# Altium PCB STM32H743I-EVAL2PCBDESIGN.PcbDoc (part 22 of 23)
Units mil, origin at the board's own origin, x right, y up, seen from the top; angles counter-clockwise.
Board outline 6558 x 5417 mil, 8 copper layers (L1_TOP, L2_GND, L3_HS1, L4_POWER, L5_SIG, L6_HS2, L7_GND, L8_BOTTOM), stack 61.368 mil thick; 620 components, 588 nets, 2945 pads, 1724 vias.
Unrouted connection lines stored in the file: 1.
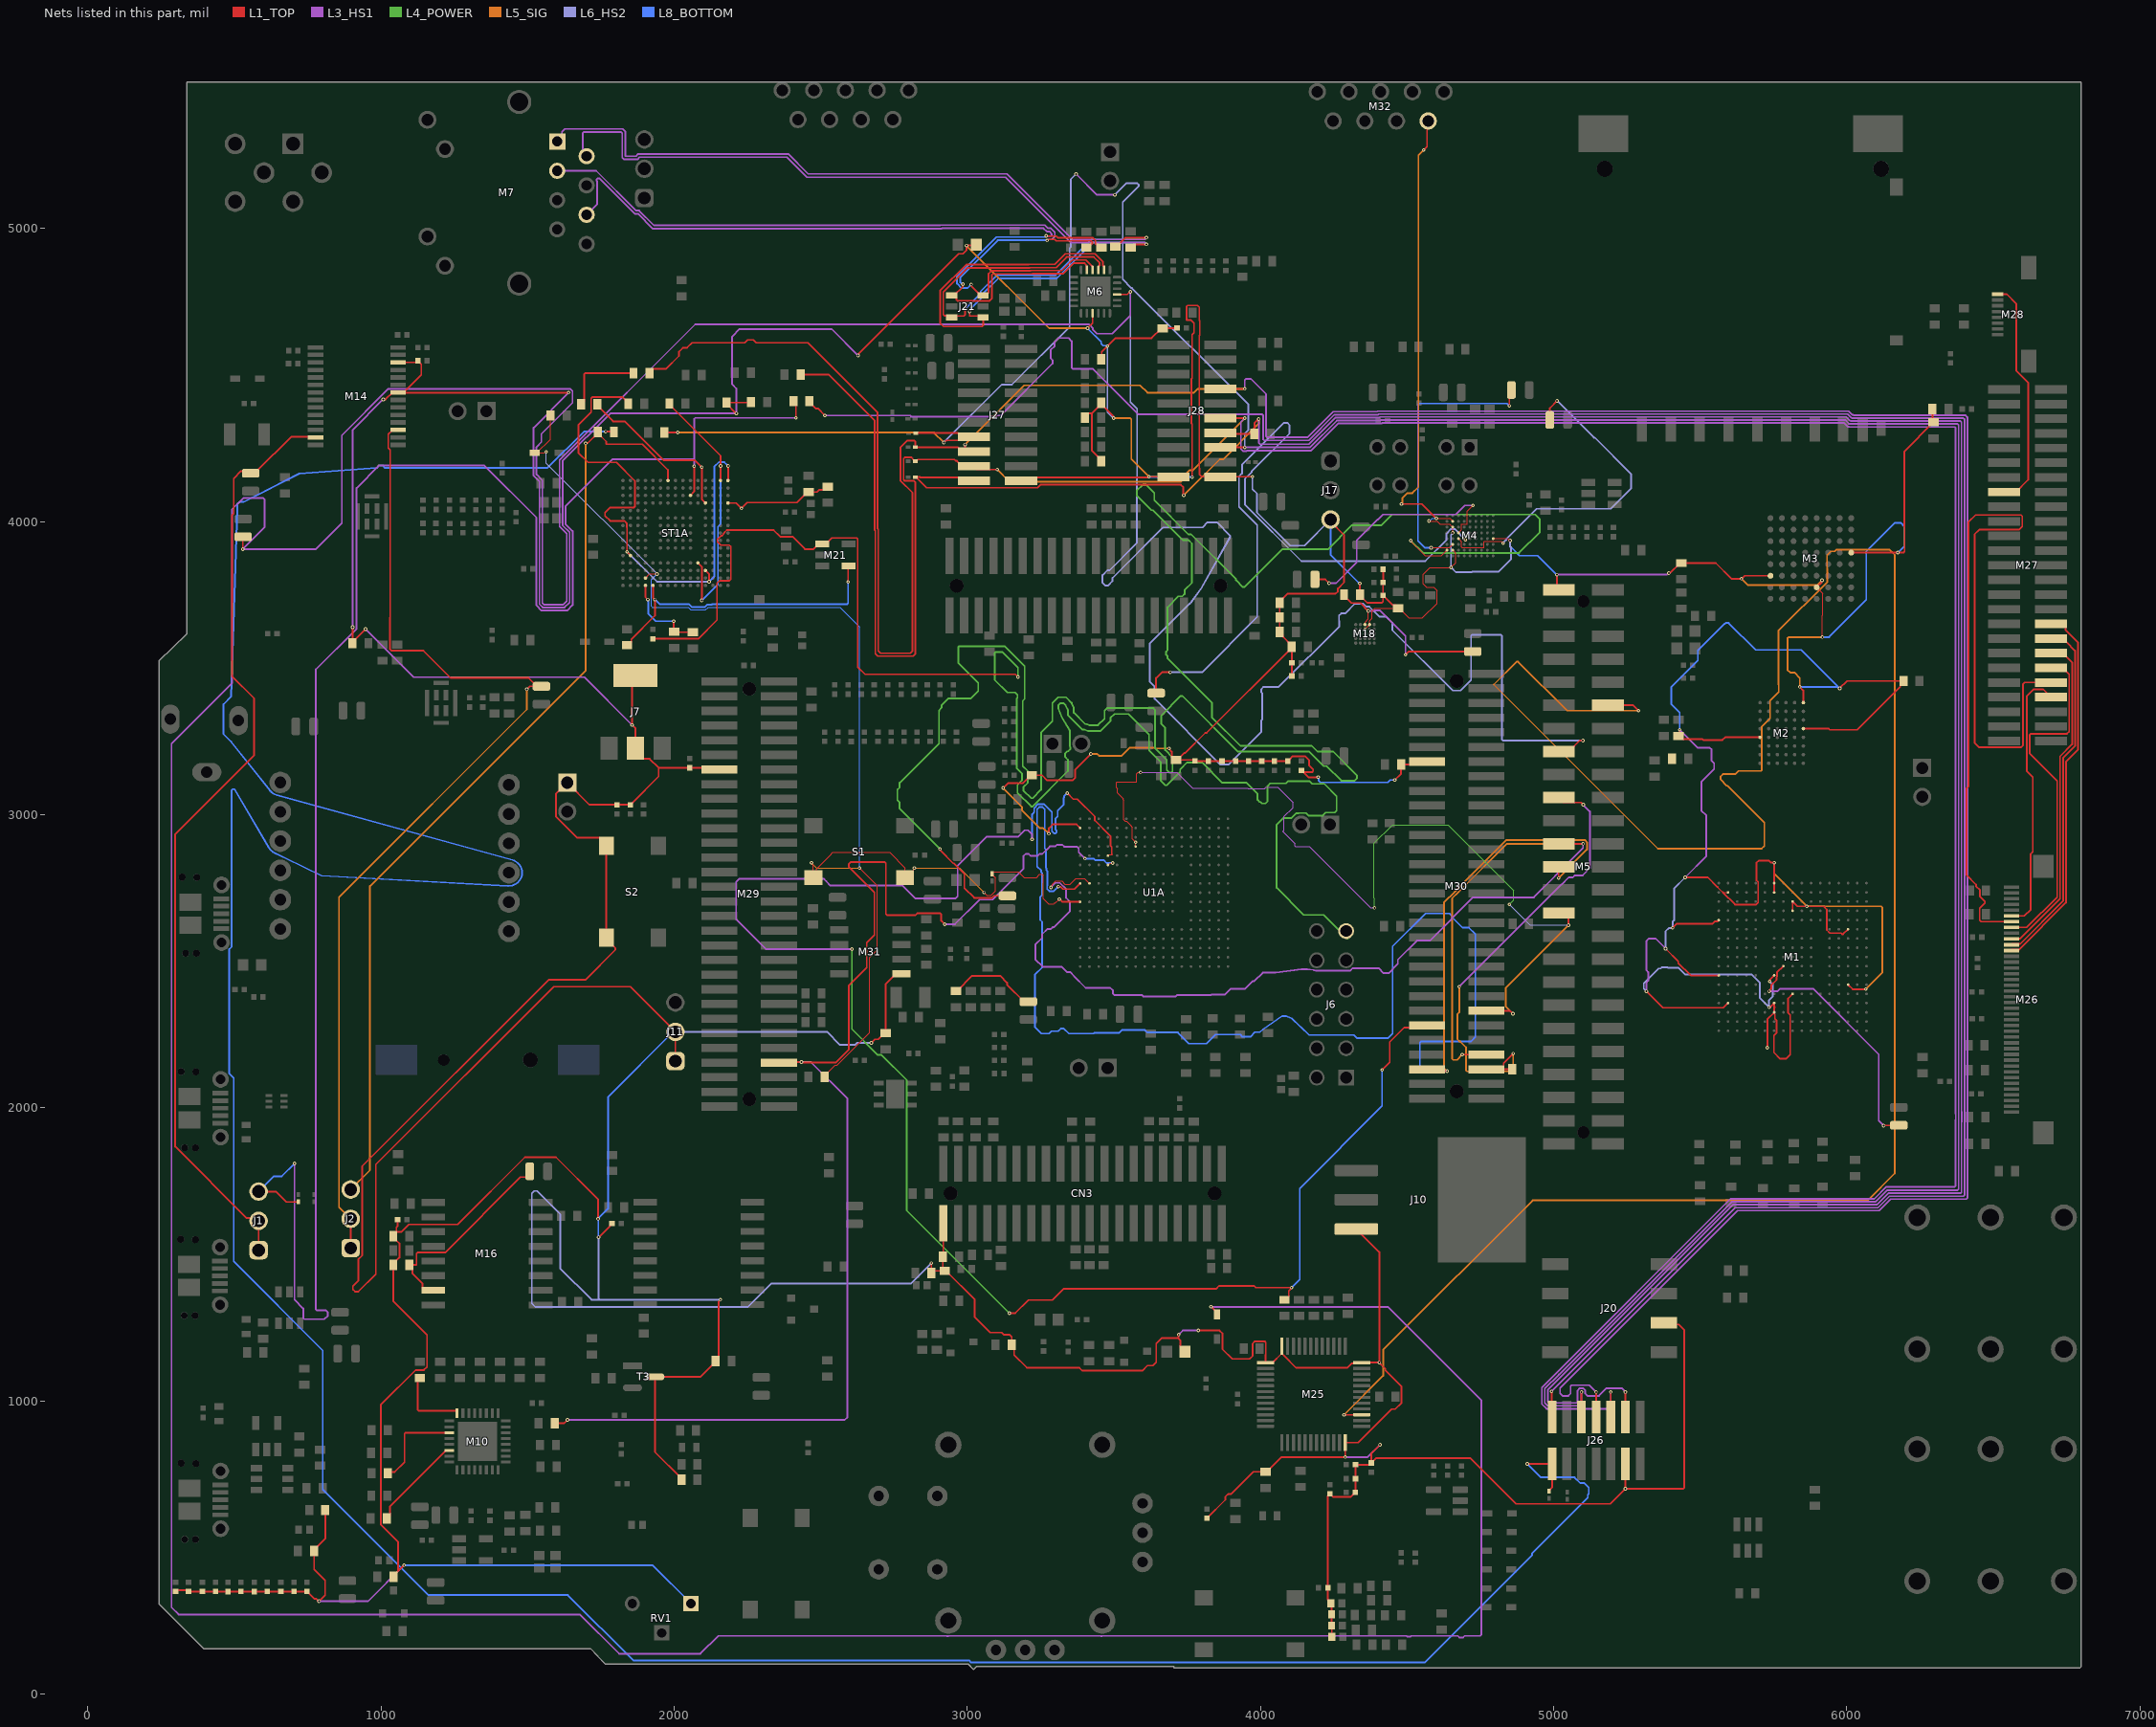
[diagram p19: the nets of this part, all layers, seen from the top]

## Via types
v1: diameter 12, hole 6, L1_TOP to L8_BOTTOM, tented both sides, 1724 vias

## Nets (pads, with @x,y where several pads share a name; then routed paths per layer and width w, separated by ;. In a path a pad name is that pad's centre, name@x,y a point inside that pad or via, vN(x,y) a via of type N, cw(c..) or ccw(c..) an arc to the next point about the centre after c; other vN are vias at no path point) (continued)
PI8: M30.12 R235.1 U1A.E4 | length 6162.4
  L1_TOP w2: U1A.E4@3479.54,2859.99 3479.99,2859.99 3484,2864 3493,2864
  L1_TOP w6: v1(3143,1299) 3163.14,1299 3208.22,1344.08 3290.46,1344.08 3328.38,1382 3848.38,1382 3858.38,1392 3978.38,1392 3984.38,1386 v1(4106,1386) 4106,1384.38 4096.72,1375.09 4096.72,1355.34 4085.94,1344.56 R235.1@4082,1344.56 ; v1(3340.48,3073.48) 3361.06,3052.91 3375.07,3052.91 3434.54,2993.43 3434.54,2980.7 3488,2927.25 3488,2894.47 3492.6,2889.87 3492.6,2864.4 3493,2864 ; v1(4415,2129) 4441,2155 4441,2224.52 4490.03,2273.55 4560.55,2273.55 M30.12@4568,2281
  L3_HS1 w6: v1(2606,2541) 2313.47,2541 2210.99,2643.47 2210.99,2769.99 2222.51,2781.51 2509.82,2781.51 2518.33,2773 2533.33,2758 2779.38,2758 2823.38,2714 2959.38,2714 2967,2721.62 2967,2825.53 3066.47,2925 3173.62,2925 3195.62,2947 3206.38,2947 3221,2932.38 v1(3221,2916)
  L4_POWER w6: v1(2606,2541) 2606,2268.62 2694.62,2180 2707.38,2180 2793,2094.38 2793,1649 v1(3143,1299)
  L8_BOTTOM w6: v1(3221,2916) 3221,3001.38 3228,3008.38 3228,3022.53 3241.47,3036 3260.53,3036 3288.26,3008.26 3288.26,2943.74 3295.51,2936.49 3300.49,2936.49 3304,2940 3304,2945.62 3301,2948.62 3301,2987 3307.83,2993.83 3307.83,3014.45 3329,3035.62 3329,3056.62 3330,3057.62 3330,3063 v1(3340.48,3073.48) ; v1(4106,1386) 4134,1414 4134,1724.86 4415,2005.86 v1(4415,2129)
PI11: M29.07 R157.1 U1A.F4 | length 4572.3
  L1_TOP w2: U1A.F4@3479.54,2828.5 3480.86,2828.5 3487,2834.64 3495.64,2834.64 v1(3496,2835)
  L1_TOP w6: R157.1@1592.56,924 1625,924 v1(1636,935) ; M29.07@2358.5,2155 2359.5,2156 v1(2434,2156) 2435.15,2154.85 2439.39,2154.85 2440.24,2154 2551.14,2154 2595,2197.86 2595,2416 2657,2478 2657,2563.86 2682.88,2589.74 2682.88,2735.26 2595,2823.14 2595,2831.63 2601.37,2838 2718.49,2838 2722,2834.49 2722,2660.51 2725.51,2657 2822.64,2657 2828.98,2663.34 2907.63,2663.34 2911.15,2659.82 2911.15,2637.85 v1(2923,2626)
  L3_HS1 w6: v1(1636,935) 2581.86,935 2591,944.14 2591,2031.29 2466.29,2156 v1(2434,2156) ; v1(2923,2626) 2957.62,2626 3041.62,2710 3086.24,2710 3191,2814.76 3191,2858.38 3198.62,2866 3209.38,2866 3215.38,2860 3240.24,2860 3246.24,2866 3255.47,2866 3281.47,2892 3300.43,2892 3305.43,2897 3324.38,2897 3330.38,2891 3373.9,2891 3379.93,2884.97 3379.93,2871.07 v1(3401,2850)
  L8_BOTTOM w6: v1(3401,2850) 3431.08,2850 3436.11,2844.97 3464.56,2844.97 3474.53,2835 v1(3496,2835)
PI12: M5.26 M30.06 U1A.H1 | length 5374.6
  L1_TOP w6: v1(3310,2754) 3311.15,2752.85 3319.14,2752.85 3325.99,2746 3365.54,2746 U1A.H1@3385.05,2765.5 ; M30.06@4568,2131 4574,2125 v1(4637,2125) ; v1(5017,2784) 5017,2820.96 M5.26@5018,2821.96
  L5_SIG w6: v1(4637,2125) 4626,2136 4626,2700.48 4664,2738.48 ; 4664,2738.53 4677.47,2752 ; 4677.52,2752 4839.22,2913.7 5106.24,2913.7 5113.86,2906.09 5113.86,2880.86 v1(5017,2784)
  L8_BOTTOM w6: v1(3310,2754) 3295,2739 3279.62,2739 3272,2746.62 3272,2757.38 3273,2758.38 3273,2807.74 3270,2810.74 3270,2816.6 3268,2818.6 3268,2880.82 3264,2884.82 3264,3018.38 3256.38,3026 3245.62,3026 3238,3018.38 3238,2823.14 3252,2809.14 3252,2803.28 3255,2800.28 3255,2765.84 3254,2764.84 3254,2724.37 3248,2718.37 3248,2641.14 3255,2634.14 3255,2478.44 3230,2453.44 3230,2275.27 3252.27,2253 3279.19,2253 3287.19,2261 3309.62,2261 3318.62,2270 3329.38,2270 3346.38,2253 3430.88,2253 3433.88,2256 3518.37,2256 3527.37,2265 3605.85,2265 3614.09,2256.76 3718.11,2256.76 3755.88,2219 3815.12,2219 3846.12,2250 3931.24,2250 3938.9,2242.34 3965.53,2242.34 3981.19,2258 3997.67,2258 4009.33,2268 4074.82,2313 4076.79,2313 4088.07,2313 4105.83,2305.45 4165.9,2248 4168.39,2248 4318.39,2248 4328.39,2238 4435.73,2238 4451,2253.27 4451,2551 4563,2663 4644.38,2663 4652.38,2655 4652.38,2652 4689.86,2614.53 4711.14,2614.53 4733,2592.67 4733,2241.38 4717.62,2226 4547.51,2226 4544,2222.49 4544,2132.51 4551.51,2125 v1(4637,2125)
PI13: M5.28 M30.07 U1A.H2 | length 3985.9
  L1_TOP w4: v1(3285,2752) 3285,2754.16 3290,2759.16 3290,2762.28 3301.72,2774 3322.03,2774 3333.03,2763 3349.97,2763 3369.48,2782.51 3399.54,2782.51 U1A.H2@3416.54,2765.5
  L1_TOP w6: v1(4688.13,2181) M30.07@4770.99,2181 ; M5.28@5018,2900.7 v1(5100.86,2900.7)
  L3_HS1 w6: v1(3285,2752) 3300,2767 3315.38,2767 3337,2745.38 3337,2715.86 3349.49,2703.37 3349.49,2669.96 3295.53,2616 3291.28,2616 3285.28,2610 3273.16,2610 3255,2591.84 3255,2579.72 3232,2556.72 3232,2506.62 3257.62,2481 3321.38,2481 3339.38,2463 3350.38,2463 3363.69,2449.69 3363.69,2448.92 3403.62,2409 3487.38,2409 3497,2399.38 3497,2388.51 3500.51,2385 3594.87,2385 3599.87,2380 3711.43,2380 3716.43,2385 3831.29,2385 3832.29,2386 3878.47,2386 3898.47,2406 3947.47,2406 3973.47,2432 3979.05,2432 4008.05,2461 4051.95,2461 4140.02,2472.3 cw(c4154.03,2363.16) 4179.98,2470.09 cw(c4154.03,2363.16) 4180.28,2470.02 ccw(c4192,2503) 4185.16,2468.67 ccw(c4192,2503) 4192,2468 4306.5,2468 4314.5,2476 4403.72,2476 4420.41,2459.31 4436.98,2459.31 4468.76,2491.09 4468.76,2505.24 4533.53,2570 4577.38,2570 4725.38,2718 4932.74,2718 5004,2789.26 5004,2789.38 5100.32,2885.7 5100.32,2900.16 v1(5100.86,2900.7)
  L5_SIG w6: 4674,2734.34 4654,2714.34 4654,2166.81 4657.51,2163.29 4670.43,2163.29 v1(4688.13,2181) ; 4674,2734.38 4681.62,2742 ; 4681.66,2742 4840.36,2900.7 v1(5100.86,2900.7)
PI14: M5.32 M30.05 R39.2 | length 1608.4
  L1_TOP w6: M30.05@4770.99,2131 M30.05@4818.51,2131 ; R39.2@4859.44,2132 4858.44,2131 M30.05@4818.51,2131 ; v1(4862,2185) 4829.51,2152.51 4829.51,2142 M30.05@4818.51,2131 ; M5.32@5018,3058.18 5034.5,3041.68 5093.32,3041.68 v1(5101,3034)
  L3_HS1 w6: v1(4678,2413) 5026,2761 5026.58,2761 5051.58,2786 5065.72,2786 5072.74,2793.02 5099.53,2793.02 5123.86,2817.35 5123.86,3011.14 v1(5101,3034)
  L5_SIG w6: v1(4678,2413) 4678,2325.5 4672,2319.5 4672,2233.62 4679.62,2226 4681.71,2226 4701.13,2206.58 4701.13,2127.51 4704.65,2124 4845.72,2124 4862,2140.28 v1(4862,2185)
PK7: M5.22 M30.13 U1A.D7 | length 3127.4
  L1_TOP w2: U1A.D7@3574.02,2891.49 v1(3574.01,2905.99) 3562,2918 3562,2956.6 3559.53,2959.08 3559.53,2961.52 3543.25,2977.8 3538.62,2977.8 3534,2982.42 3534,3049.44 3532,3051.44 3532,3054.7 3512,3074.7 3512,3089.44 3509.2,3092.24 3509.2,3110.83 3510.37,3112 3577.92,3112 3577.92,3139.83 3582,3143.91 3590.91,3143.91 v1(3591,3144)
  L1_TOP w6: M30.13@4770.99,2331 4851,2331 v1(4861,2321) ; M5.22@5018,2664.48 5034.5,2664.48 5051,2647.98 v1(5051,2623)
  L3_HS1 w2: v1(3591,3144) 3714.44,3144 3768.44,3090 3774.53,3090 3775.53,3091 3955.94,3091 3957.94,3089 4014.56,3089 4018.56,3093 4059,3093 4084.48,3067.52 4085.52,3067.52 4111,3042.04 4111,3024 4081,2994 4081,2947.21 4076.74,2942.95 4076.74,2941.3 4117.55,2900.49 4117.55,2893.17 4118.72,2892 4166,2892 4376,2682 v1(4389.08,2682)
  L4_POWER w2: v1(4389.08,2682) 4389.08,2712.36 4387,2714.44 4387,2902 4450,2965 4640,2965 4864,2741 4864,2709 v1(4849,2694)
  L5_SIG w6: v1(4861,2321) 4836.49,2345.51 4836.49,2408.49 v1(5051,2623)
  L6_HS2 w2: v1(4849,2694) 4920,2623 v1(5051,2623)
POTENTIOMETER: R216.1 SB20.1 | length 309.1
  L1_TOP w6: R216.1@2961,2398.56 2964.94,2398.56 3016.38,2450 3112.38,2450 3135.66,2426.72 3135.66,2419.34 3193,2362 SB20.1@3208,2362
QSPI_BK1_NCS: M16.7 R198.1 SB23.1 | length 705.7
  L1_TOP w6: M16.7@1177.73,1377 1150.33,1377 1141.52,1385.81 1141.52,1399.98 1107.34,1434.17 1107.34,1453.22 R198.1@1096.56,1464 1119.34,1464 1120.57,1465.24 1120.57,1502.49 1124.09,1506 1218.05,1506 1475.55,1763.5 1495.34,1763.5 1507,1775.16 SB23.1@1507,1783
R2: M26.35 M27.07 | length 918
  L1_TOP w6: M26.35@6562.11,2654.43 6606.01,2654.43 6627.94,2676.37 6627.94,2865.99 6635,2873.05 6635,3127.77 6614,3148.77 6614,3403.49 6638.51,3428 6670,3428 M27.07@6697,3401
R3: M26.34 M27.09 | length 3102.2
  L1_TOP w6: M26.34@6562.11,2634.75 6561.58,2635.28 6457.88,2635.28 6453.78,2639.38 6453.78,2680.62 6471.68,2698.51 6471.68,2703.49 6454.78,2720.38 6454.78,2742.08 6441.22,2755.64 6441.22,2761.62 6409,2793.84 6409,3089.62 6414.77,3095.38 6414.77,3997.39 6439.87,4022.5 6594.9,4022.5 6599,4018.4 6599,3983.6 6587.9,3972.5 6452.12,3972.5 6436,3956.38 6436,3245.62 6452.12,3229.5 6594.9,3229.5 6601,3235.6 6601,3444.78 6607.22,3451 M27.09@6697,3451
R4: M26.33 M27.11 | length 1196.9
  L1_TOP w6: M26.33@6562.11,2615.06 6562.37,2615.33 6614.33,2615.33 6718,2719 6718,3115.62 6624,3209.62 6624,3271 6629,3276 6751.4,3276 6759,3283.6 6759,3479.5 6737.5,3501 M27.11@6697,3501
R5: M26.31 M27.13 | length 1131.3
  L1_TOP w6: M26.31@6562.11,2575.69 6563.93,2577.51 6592.51,2577.51 6728,2713 6728,3199 6769,3240 6769,3519.5 6737.5,3551 M27.13@6697,3551
R6: M26.30 M27.15 | length 1208.3
  L1_TOP w6: M26.30@6562.11,2556.01 6564.79,2558.69 6591.66,2558.69 6738,2705.03 6738,3193 6779,3234 6779,3559.5 6749,3589.5 6737.5,3601 M27.15@6697,3601
R7: M26.29 M27.17 | length 1282
  L1_TOP w6: M26.29@6562.11,2536.32 6565.02,2539.23 6587.23,2539.23 6748,2700 6748,3180.17 6789,3221.17 6789,3588.4 6746.38,3631.01 6746.38,3639.5 6740.37,3645.51 6702.49,3645.51 M27.17@6697,3651
RD_N: J21.6 M6.22 M7.6 R130.1 | length 2991.4
  L1_TOP w6: v1(3013,4809) 3013,4803.9 3045.5,4771.4 J21.6@3053.75,4771.4 3062,4771.4 3072.35,4781.75 3072.35,4846.04 3082.31,4856 3216.49,4856 3217.21,4856.72 3321.96,4856.72 3357.9,4892.66 3404.49,4892.66 3412.68,4884.47 3427.16,4869.99 M6.22@3427.16,4858.84 ; v1(3269,4975) 3270,4974 3302.74,4974 3307.97,4968.78 3427.04,4968.78 3437,4958.82 3437,4948.74 3440.51,4945.22 3446.22,4945.22 R130.1@3457,4934.44
  L3_HS1 w6: M7.6@1700.91,5047.02 1736.47,5082.57 1736.47,5161.74 1735.52,5162.69 1735.52,5167.66 1739.04,5171.18 1744.01,5171.18 1864.93,5050.26 1875.82,5050.26 1926.08,5000 2912.94,5000 2913.94,5001 3259.49,5001 3270.49,4990 3280,4990 3287.51,4982.49 3287.51,4977.51 3284,4974 3270,4974 v1(3269,4975)
  L8_BOTTOM w6: v1(3013,4809) 3001.08,4797.08 2990.47,4797.08 2990.38,4797 2979.62,4797 2964.66,4811.96 2964.66,4836.9 3098.75,4971 3263.38,4971 3267.38,4975 v1(3269,4975)
RD_P: J21.1 M6.23 M7.3 R131.1 | length 3042.5
  L1_TOP w6: J21.1@2946.25,4771.4 J21.1@2954.5,4771.4 ; v1(2985,4810) 2985,4801.9 J21.1@2954.5,4771.4 ; v1(3272,4959) 3273.62,4959 3277.62,4963 3298.19,4963 3303.41,4957.78 3422.48,4957.78 3426,4954.26 3426,4948.74 3422.49,4945.22 3416.78,4945.22 R131.1@3406,4934.44 ; M6.23@3407.47,4858.84 3406.82,4859.49 3406.82,4874.78 3399.93,4881.66 3362.46,4881.66 3326.52,4845.72 3221.76,4845.72 3221.05,4845 3086.86,4845 3083.35,4841.49 3083.35,4760.85 3075.9,4753.4 2966.01,4753.4 2962.5,4756.92 2962.5,4763.4 J21.1@2954.5,4771.4
  L3_HS1 w6: M7.3@1600.91,5197.02 1733.73,5197.02 1869.48,5061.26 1880.38,5061.26 1930.64,5011 2908.38,5011 2909.38,5012 3264.04,5012 3275.04,5001 3284.56,5001 3298.51,4987.04 3298.51,4972.96 3288.56,4963 3277.62,4963 3273.62,4959 v1(3272,4959)
  L8_BOTTOM w6: v1(2985,4810) 2983.38,4810 2980.38,4813 2979.17,4813 2975.66,4816.51 2975.66,4832.35 3103.31,4960 3271,4960 v1(3272,4959)
REFSEL0: M10.8 R178.2 | length 253.2
  L1_TOP w6: R178.2@1132,1077.44 1125.26,1070.7 1125.26,969.25 1128.78,965.74 1257,965.74 1259,963.74 M10.8@1259,957.5
REFSEL1: M10.11 R179.2 | length 323.6
  L1_TOP w6: R179.2@1022.56,753 1026.5,756.94 1045.94,756.94 1080,791 1080,887.49 1083.51,891 M10.11@1232.5,891
REFSEL2: M10.14 R180.2 | length 326.6
  L1_TOP w6: R180.2@1019.56,599 1030.34,609.78 1030.34,639.84 1221.5,831 M10.14@1232.5,831
RESET: D39.2 M5.36 M6.15 SB41.1 | length 20788.1
  L1_TOP w6: v1(528,3906) 528,3947 SB41.1@529,3948 ; M6.15@3510.84,4775.16 3545.53,4775.16 3554.38,4784 v1(3556,4784) ; v1(3831,1321) 3832.43,1321 3852,1301.43 D39.2@3852,1295.13 ; M5.36@5018,3215.66 5052.5,3215.66 5089.84,3253 v1(5100,3253)
  L3_HS1 w6: v1(3556,4784) 3556,4703.51 3493.49,4641 3441.62,4641 3428.5,4654.12 3428.5,4659.88 3415.38,4673 2071.47,4673 1609,4210.53 1609,3983.28 1633.21,3959.07 1633.21,3728.5 1621.5,3716.79 1555.51,3716.79 1550,3722.3 1550,4140.93 1530,4160.93 1530,4254.53 1547,4271.53 1547,4299.28 1653,4405.28 1653,4445.38 1645.38,4453 1024.62,4453 866,4294.38 866,3994.51 777.49,3906 v1(528,3906) 602,3980 602,4076.49 598.49,4080 529.62,4080 491,4041.38 491,3448.65 285,3242.65 285,295 309,271 1678,271 1812,137 2089,137 2150,198 2924.75,198 ccw(c2935,250) 2935.1,197 3449.75,198 ccw(c3460,250) 3460.05,197 4497.62,198 4500.62,195 4511.38,195 4514.38,198 4673.62,198 4679.62,192 4690.38,192 4696.38,198 4749.49,198 4753,201.51 4753,1002.86 4435.86,1320 3832,1320 v1(3831,1321)
  L6_HS2 w6: v1(3556,4784) 3556,4408.47 3579,4385.47 3579,4143.81 3578,4142.81 3578,3926 3486,3834 3477.62,3834 3461,3817.38 3461,3790.62 3469.62,3782 3480.38,3782 3495,3796.62 3495,3807.38 3667.62,3980 3802.12,3980 3819.62,3997.5 3851.5,3997.5 3896.43,3952.58 3896.43,3947.6 3798,3772.18 3762.76,3723.76 3759.24,3720.24 3622,3583 3622,3454 3639,3437 3639,3395.3 3863.3,3171 3891,3171 4003,3283 4003,3321.37 4006,3324.37 4006,3414.62 4003,3417.62 4003,3428.38 4007,3432.38 4010.62,3436 4062.38,3436 4269,3642.62 4269,3660.5 4268,3661.5 4268,3679.38 4275.62,3687 4289.62,3687 4322.44,3719.82 4351.18,3719.82 4361,3710 4371.38,3710 4405.38,3676 4428.38,3676 4450,3654.38 4450,3629.64 4656.07,3423.57 4682.93,3423.57 4718.57,3459.21 4718.57,3610.49 4722.08,3614 4819.87,3614 4823.38,3610.49 4823.38,3256.51 4826.9,3253 v1(5100,3253)
RS232_RX: J2.1 J2.2 M14.17 SB21.1 | length 3588
  L1_TOP w6: J2.1@896,1521 J2.2@896,1621 ; M14.17@1057.51,4312.35 1038.51,4312.35 1024.5,4298.34 1024.5,4251.26 1031.12,4244.64 1031.12,3672.88 1030.28,3672.05 1030.28,3563.88 1034.38,3559.78 1144.22,3559.78 1237.5,3466.5 1503.5,3466.5 1532,3438 SB21.1@1547,3438 1508,3438 1498,3428 v1(1497,3428)
  L5_SIG w6: J2.2@896,1621 856.5,1660.5 856.5,2718.5 1497,3359 v1(1497,3428)
RS232_TX: J1.1 J1.2 M14.13 SB18.1 | length 3276.7
  L1_TOP w6: SB18.1@555,4165 558,4165 569,4165 SB18.1@576,4172 ; J1.1@582,1514 J1.2@582,1614 572.71,1623.29 541.5,1623.29 297.7,1867.09 297.7,2933.65 566.72,3202.66 566.72,3396.45 491,3472.16 491,4021.51 497,4027.51 497,4147.31 521.69,4172 SB18.1@576,4172 ; M14.13@775.51,4286.76 773.28,4289 693,4289 SB18.1@576,4172
RST: M27.36 M28.8 | length 794.3
  L1_TOP w6: M28.8@6514.56,4775.9 6546.1,4775.9 6578.27,4743.73 6578.27,4515.28 6619,4474.55 6619,4142.5 6577.5,4101 M27.36@6537,4101
SAI1_MCLKA: M4.D3 SB7.2 | length 823.9
  L1_TOP w2: M4.D3@4675.63,3961.69 4686,3972.06 4686,3991 4706,3991 4706,4036 v1(4725,4055)
  L1_TOP w6: SB7.2@4186,3803 4221,3803 v1(4234,3790)
  L3_HS1 w6: v1(4234,3790) 4258,3790 4328.48,3860.48 4328.48,3936.01 4399.97,4007.5 4401.5,4007.5 4418,4024 4665.53,4024 4696.53,4055 v1(4725,4055)
SAI_FSA: M4.E3 SB12.2 | length 1193
  L1_TOP w2: M4.E3@4675.63,3942 4686,3931.63 4686,3913.17 4687.17,3912 4762,3912 4763.17,3913.17 4763.17,3914.83 4763.17,3930.83 4764.34,3932 4822,3932 v1(4828,3926)
  L1_TOP w6: SB12.2@4987,4347 4987,4387 v1(5012,4412)
  L6_HS2 w6: v1(4828,3926) 4828,3927.45 4837.88,3937.33 4837.88,3939.27 4942.62,4044 5194.38,4044 5265,4114.62 5265,4161.86 5140.5,4286.35 5137.65,4286.35 v1(5012,4412)
SAI_SCKA: M4.G1 SB14.2 | length 7985.7
  L1_TOP w4: v1(4513,3935) 4513,3933 4562,3884 4617.63,3884 M4.G1@4636,3902.37
  L1_TOP w6: v1(2906.28,2882.86) 2907.43,2881.71 2907.43,2878.06 2951.49,2834 2954.38,2834 2989.6,2798.78 2989.6,2749.88 3023.48,2716 3084.7,2716 3091.7,2723 SB14.2@3137,2723
  L4_POWER w6: v1(2906.28,2882.86) 2769,3020.14 2769,3041.16 2761,3049.16 2761,3084.87 2769,3092.87 2769,3108.86 2903,3242.86 2903,3318 2903,3352.87 2904,3353.87 2904,3356.6 2912,3364.6 2912,3372.98 2936.02,3397 3012.67,3397 3037,3421.33 3037,3449.86 2969,3517.86 2969,3571.49 2972.51,3575 3127.45,3575 3195.54,3506.91 3195.54,3394.87 3189,3388.33 3189,3165.65 3206.02,3148.63 3206.02,3108.86 3191,3093.85 3191,3082.9 3217.63,3056.27 3222.6,3056.27 3251.57,3085.24 3251.57,3280.11 3290,3318.54 3290,3381.35 3309.33,3400.68 3336.67,3400.68 3356,3381.35 3356,3378.44 3363,3365.86 3363,3347.86 3400.89,3309.97 cw(c3389,3242) 3416.38,3305.34 3445.67,3305.34 3468.1,3327.77 3468.1,3354.81 3477.28,3364 3634,3364 3640,3358 3640,3227.33 3680,3187.33 3680,3153 3690.04,3142.96 3695.01,3142.96 3700,3147.95 3700,3195.62 3675,3220.62 3675,3296.38 3662,3309.38 3662,3338.63 3728.3,3404.92 3733.27,3404.92 3923.19,3215 4166.43,3215 4215.93,3165.5 4226.07,3165.5 4275.57,3116 4321.38,3116 4329,3123.62 4329,3134.38 4248.05,3215.33 4194.38,3215.33 4174.72,3235 3931.47,3235 3834,3332.47 3834,3382 3683,3533 3683,3540.62 3678,3545.62 3678,3556.38 3683,3561.38 3683,3707.89 3720.11,3745 3733.38,3745 3741,3752.62 3741,3765.89 3766,3790.89 3766,3925.36 3754.9,3936.46 3735.39,3936.46 3632.86,4039 3628.62,4039 3578,4089.62 3578,4105.38 3598.62,4126 3609.38,4126 3638,4097.38 3638,4072.62 3754.15,3956.46 3763.18,3956.46 3916.43,3803.22 3916.43,3799.99 3940.03,3776.38 3945,3776.38 4074.06,3905.44 4229.83,3905.44 4312.38,3988 4413,3988 4449,4024 4937.49,4024 4953,4008.49 4953,3964 4882,3893 4555,3893 v1(4513,3935)
SAI_SDA: M4.E4 SB16.2 | length 2504.7
  L1_TOP w2: M4.E4@4695.31,3942 4695.31,3941.69 v1@4702,3935
  L1_TOP w6: SB16.2@3644,3415 3644,3466.3 3663.7,3486 v1(3692,3486)
  L6_HS2 w6: v1(3692,3486) 3800.38,3486 3989,3674.62 3989,3987.57 3927,4049.57 3927,4154 3937,4164 3937,4193.38 4080.62,4337 4091.38,4337 4099,4329.38 4099,4300.38 3969.67,4171.06 3969.67,4168.38 3947,4145.71 3947,4057.86 4139.86,3865 4562.38,3865 4634.47,3937.09 4634.47,3958.6 4650.56,3974.69 4662.31,3974.69 v1(4698.66,3938.34)
SAI_SDB: M4.F2 SB10.2 | length 972
  L1_TOP w2: v1(4582,3911) 4583,3912 4645.63,3912 M4.F2@4655.94,3922.31
  L1_TOP w6: v1(4849,4395) 4849,4442 SB10.2@4856,4449
  L8_BOTTOM w6: v1(4582,3911) 4560.62,3911 4537,3934.62 4537,4399.49 4540.51,4403 4841,4403 v1(4849,4395)
SDCKE1: R100.1
SDIO1_D0DIR: M18.A3 R201.2 SB24.1 | length 620.7
  L1_TOP w2: M18.A3@4356.5,3648.5 4357,3648.99 4357,3657 4368,3668 v1(4368,3695)
  L1_TOP w6: R201.2@4285.11,3751 4285.11,3747.06 4310.17,3722 4341,3722 v1(4368,3695) ; v1(4495,3546) 4506,3557 SB24.1@4724,3557
  L3_HS1 w6: v1(4368,3695) 4387.5,3695 4389.5,3697 4407.38,3697 4495,3609.38 v1(4495,3546)
SDNWE: M1.K8 SB4.1 | length 878.8
  L1_TOP w6: v1(5735,2397) 5735,2398.62 5742.32,2405.94 5742.32,2413.32 5742.5,2413.5 5742.5,2418.11 5760.74,2436.36 5760.74,2445.63 5762.24,2447.13 5762.24,2461.28 M1.K8@5783.99,2483.02 ; v1(6126,1939) 6126.51,1939.51 6150.83,1939.51 6151.34,1940.02 SB4.1@6177.49,1940.02
  L3_HS1 w6: v1(5735,2397) 5763.62,2397 5772.62,2406 5885,2406 6109,2182 6109,1956 v1(6126,1939)
STLK_LED: R229.1 R230.1 ST1A.D15 | length 379.2
  L1_TOP w6: ST1A.D15@2183.31,4063.54 2210.46,4063.54 v1(2229,4045) 2249,4065 2419.06,4065 2455.06,4101 2487.61,4101 2495.39,4108.78 2513.22,4108.78 R229.1@2524,4119.56
STLK_VCP_RX: D25.1 J1.3 R255.2 ST1A.C10 | length 6544.7
  L1_TOP w6: J1.3@582,1714 641.29,1714 676.59,1678.7 D25.1@718,1678.7 ; ST1A.C10@2055.36,4089.13 2055.36,4090.36 2068,4103 v1(2068,4189) ; R255.2@2406.44,4411 2415,4402.44 v1(2415,4354)
  L3_HS1 w6: v1(704.64,1809.68) 704.64,1344.74 734.36,1315.01 734.36,1281.88 737.88,1278.36 805.75,1278.36 818,1290.62 818,1301.38 810.38,1309 780.51,1309 777,1312.51 777,3495.62 916,3634.62 916,4114.38 993.62,4192 1351.53,4192 1530,4013.53 1530,3714.02 1547.23,3696.79 1634.77,3696.79 1653.21,3715.23 1653.21,3967.36 1629,3991.57 1629,4052.53 1788.81,4212.33 2068,4212.33 ; v1(2068,4189) 2068,4212.33 ; v1(2415,4354) 2071.51,4354 2068,4350.49 2068,4212.33
  L8_BOTTOM w6: J1.3@582,1714 634.31,1766.31 661.27,1766.31 v1(704.64,1809.68)
STLK_VCP_TX: J2.3 R256.2 ST1A.A7 | length 3270
  L1_TOP w6: v1(1698,4267) 1699.15,4268.15 1704.97,4268.15 R256.2@1738.88,4302.06 ; R256.2@1738.88,4306 R256.2@1738.88,4302.06 ; ST1A.A7@1978.59,4140.31 1978.59,4176.41 1891,4264 1769,4264 1767.85,4265.15 1767.85,4273.09 R256.2@1738.88,4302.06
  L5_SIG w6: J2.3@896,1721 962,1787 962,2756.38 1698,3492.38 v1(1698,4267)
T_NRST: D2.1 D3.2 R220.1 R254.1 S1.1 S1.2 ST1A.P4 U1A.K1 | length 4798.6
  L1_TOP w4: D3.2@1523.87,4234 D3.2@1530.17,4234 ; v1(1563,4238) 1560.84,4238 1556.84,4234 D3.2@1530.17,4234 ; R254.1@1577.44,4362 1577.44,4281.27 D3.2@1530.17,4234 ; ST1A.P4@1901.82,3807.64 1915.18,3821 v1(1941,3821) ; v1(2468,2836) 2468,2833.84 2474.5,2827.33 S1.2@2474.5,2785.42 2485.66,2796.58 2485.66,2814.66 2531,2860 2531,2860.57 2541.43,2871 2735,2871 2787.5,2818.5 S1.1@2787.5,2785.42 2792.42,2785.42 2816.01,2809.01 2816.01,2812.84 2819,2815.84 v1(2819,2818) ; R220.1@2512.56,2105 2512.56,2108.94 2548.62,2145 2554.87,2145 2666,2256.13 2666,2512.97 2691.88,2538.85 2691.88,2758.12 v1(2632,2818) ; v1(3057,2735) 3067,2725 3080.97,2725 3095.91,2739.94 3095.91,2784.55 3092.39,2788.06 3091.78,2788.06 3084,2795.84 3084,2800.76 3087.91,2804.67 3108.58,2804.67 3108.91,2805 3174.46,2805 3193.46,2786 3236.54,2786 3246.54,2796 3256.66,2796 3259,2793.66 3259,2713.89 3276.89,2696 3294.72,2696 3296.72,2698 3300,2698 v1(3314,2712)
  L1_TOP w6: v1(3314,2712) 3315.62,2712 3325.11,2702.51 U1A.K1@3385.05,2702.51
  L5_SIG w4: v1(2468,2836) 2486,2818 v1(2632,2818) ; v1(2819,2818) 2974,2818 v1(3057,2735)
  L6_HS2 w4: v1(1563,4238) 1563,4199 v1(1941,3821)
  L8_BOTTOM w4: v1(1941,3821) 1922,3802 1922,3710.34 1924.34,3708 2047.75,3708 2056.75,3699 2107.25,3699 2116.25,3708 2564.66,3708 2632,3640.66 v1(2632,2818)
T_PWR_EN: M21.4 R225.1 ST1A.R5 | length 1051.9
  L1_TOP w6: R225.1@1839,3577.88 1842.94,3577.88 1853.72,3588.66 1853.72,3598.72 1934,3679 v1(1934,3734) 1927.41,3740.59 ST1A.R5@1927.41,3782.05 ; v1(2593,3794) 2593,3846.32 M21.4@2595.28,3848.6
  L8_BOTTOM w6: v1(1934,3734) 1935.46,3734 1951.46,3718 2050.47,3718 2060.47,3708 2103.53,3708 2112.53,3717 2128.14,3717 2129.14,3718 2589.49,3718 2593,3721.51 v1(2593,3794)
T_PWR_EXT: R223.2 R228.2 ST1A.R4 | length 297.7
  L1_TOP w6: ST1A.R4@1901.82,3782.05 1901.82,3742.18 v1(1910,3734) ; v1(1998,3660) 1998,3626.56 2002,3622.56 R223.2@2063,3622.56
  L8_BOTTOM w6: v1(1910,3734) 1911.15,3732.85 1911.15,3685.85 1937,3660 v1(1998,3660)
T_SWCLK: R4.2 ST1A.A14 ST1A.M11 | length 953.4
  L1_TOP w6: R4.2@1983.44,4403 1983.44,4399.06 2158.13,4224.37 v1(2158.13,4190) ST1A.A14@2158.13,4140.72 ; ST1A.M11@2080.95,3858.82 2094,3845.77 v1(2094,3731)
  L8_BOTTOM w6: v1(2094,3731) 2149,3786 2149,3982.62 2158.13,3991.76 v1(2158.13,4190)
T_SWDIO: R3.2 ST1A.A15 ST1A.L2 ST1A.N12 | length 1858
  L1_TOP w6: R3.2@1843,4402 1843,4405.94 1824.22,4424.72 1720.44,4424.72 1716.34,4420.62 1716.34,4373.34 1673,4330 1673,4235 1705.97,4202.03 1802.93,4202.03 1865.75,4139.21 1865.75,4051.5 1862.24,4047.98 1781.6,4047.98 1764,4030.38 1764,4019.62 1781.16,4002.46 1830.03,4002.46 1837.64,3994.85 1837.64,3981.39 1839,3980.02 1839,3896.52 1850.64,3884.89 ST1A.L2@1850.64,3884.41 ; ST1A.N12@2106.54,3833.23 2119,3820.77 v1(2119,3795) ; ST1A.A15@2183.72,4140.72 v1(2183.72,4190)
  L6_HS2 w6: v1(1839,3897) 1941,3795 v1(2119,3795)
  L8_BOTTOM w6: v1(2119,3795) 2136.45,3812.45 2136.45,4186.7 2152.75,4203 2170.72,4203 v1(2183.72,4190)
T_SWO: R5.2 ST1A.D12 | length 575.5
  L1_TOP w6: R5.2@1737.12,4400 1737.12,4396.06 1791.18,4342 1831.05,4342 1964.05,4209 2071,4209 v1(2094,4186) 2094,4076.09 ST1A.D12@2106.54,4063.54
T_TCK/SWCLK: D36.1 J26.6 J27.4 J28.9 R250.2 | length 10662.2
  L1_TOP w6: R250.2@2431.56,4502 2525.53,4502 2684,4343.53 2684,3970.85 2686,3968.85 2686,3548.8 2693.8,3541 2815.2,3541 2823,3548.8 2823,4134.16 2818.06,4139.09 2786.43,4139.09 2782.33,4143.2 2782.33,4214.5 2786.73,4218.91 2809.27,4218.91 2813.37,4214.8 2813.37,4212.78 2820.15,4206 D36.1@2822.61,4206 ; D36.1@2825.07,4206 2831.07,4212 2956.35,4212 2960.92,4207.43 2964.09,4207.43 2982.53,4189 J27.4@3022.88,4189 3034.45,4177.43 v1(3101.88,4177.43) ; J28.9@3863.12,4353 v1(3946.12,4353) ; J26.6@5195,945 v1(5195,1030)
  L3_HS1 w6: v1(3946.12,4353) 3933.12,4340 3933.12,4247.62 3940.73,4240 3951.5,4240 3953.5,4242 4171.86,4242 4264.86,4335 4413.86,4335 4415.86,4337 5990.14,4337 6003.14,4324 6005.9,4324 6006.9,4323 6368.25,4323 6371.77,4319.49 6371.77,1978.76 6372,1978.53 6372,1959.47 6371.77,1959.24 6371.77,1733.51 6368.25,1730 6135.28,1730 6094.28,1689 5603.33,1689 4960,1045.67 4960,988.72 4975.72,973 5191.49,973 5195,976.51 v1(5195,1030)
  L5_SIG w6: v1(3101.88,4177.43) 3143.32,4136 3729.12,4136 3744,4150.88 3744,4161.53 3757.47,4175 3768.12,4175 v1(3946.12,4353)
T_TDI: D34.1 J26.10 J27.8 J28.5 R252.2 | length 10941.6
  L1_TOP w6: R252.2@1965.56,4304 v1(2012,4304) ; D34.1@2823.61,4302 2967.45,4302 2968.88,4300.57 3005.31,4300.57 J27.8@3019.88,4286 ; v1(2920,4270) 2921.62,4270 2929.06,4277.43 3011.31,4277.43 J27.8@3019.88,4286 ; J27.8@3021.38,4287.5 J27.8@3019.88,4286 ; J28.5@3863.12,4253 v1(3946.12,4253) ; J26.10@5095,945 v1(5095,1030)
  L3_HS1 w6: v1(3371,5186) 3442,5115 v1(3503,5115) ; v1(3946.12,4253) 4168.72,4253 4260.72,4345 4409.72,4345 4411.72,4347 5994.28,4347 6007.28,4334 6010.05,4334 6011.05,4333 6378.25,4333 6381.77,4329.49 6381.77,1982.9 6382,1982.67 6382,1955.33 6381.77,1955.1 6381.77,1722.51 6378.25,1719 6138.43,1719 6098.43,1679 5607.47,1679 5018.37,1089.9 4970,1041.53 4970,992.86 4979.86,983 5091.49,983 5095,986.51 v1(5095,1030)
  L5_SIG w6: v1(2012,4304) 2886,4304 v1(2920,4270)
  L6_HS2 w6: v1(2920,4270) 3117.88,4467.88 3152.27,4467.88 3349,4664.62 3349,4932.86 3352.93,4936.79 3352.93,5167.93 v1(3371,5186) ; v1(3503,5115) 3543,5155 3579,5155 3584.51,5149.49 3584.51,5144.51 3530,5090 3530,4826.62 3559.62,4797 3561.38,4797 3959.12,4399.27 3959.12,4313 3946.12,4300 v1(3946.12,4253)
T_TDO/SWO: D37.1 J26.8 J27.6 J28.13 R251.2 | length 11340.9
  L1_TOP w6: R251.2@1916.12,4507 1916.12,4510.94 1926.9,4521.72 1972.33,4521.72 2016,4565.38 2016,4579.53 2029.47,4593 2043.62,4593 2060.62,4610 2240.47,4610 2250.47,4620 2269.53,4620 2279.53,4610 2455.72,4610 2694,4371.72 2694,3974.99 2696,3972.99 2696,3558.8 2703.8,3551 2805.2,3551 2813,3558.8 2813,4098.38 2772.33,4139.05 2772.33,4254.1 2795.14,4276.91 2818.79,4276.91 2822.3,4273.39 D37.1@2822.3,4254 2967.53,4254 2983.53,4238 J27.6@3003.57,4238 ; v1(2992,4263) 2992,4250.57 3003.57,4239 J27.6@3022.88,4239 ; J28.13@3863.12,4453 v1(3946.12,4453) ; J26.8@5145,945 v1(5145,1030)
  L3_HS1 w6: v1(3946.12,4453) 3946.12,4483.49 3949.63,4487 3967.05,4487 4019,4435.05 4019,4291.51 4022.51,4288 4161.29,4288 4248.29,4375 4397.29,4375 4399.29,4377 6006.71,4377 6019.71,4364 6022.47,4364 6023.47,4363 6404.77,4363 6411.77,4356 6411.77,1995.33 6412,1995.1 6412,1942.9 6411.77,1942.67 6411.77,1691.81 6408.25,1688.29 6150.14,1688.29 6110.85,1649 5628,1649 5022,1043 5022,1025.49 5030.49,1017 5050.38,1017 5058,1024.62 5058,1049.49 5061.51,1053 5122,1053 v1(5145,1030)
  L5_SIG w6: v1(2992,4263) 3194,4465 3589.5,4465 3614.5,4440 3773,4440 3786,4453 v1(3946.12,4453)
T_TMS/SWDIO: D35.1 J26.4 J27.2 J28.7 R249.2 | length 9034.1
  L1_TOP w6: J27.2@3022.88,4139 3011.31,4150.57 2839.73,4150.57 2838.29,4152 D35.1@2822.3,4152 2824.76,4152 2861.33,4115.43 3238.94,4115.43 3249.51,4126 3728,4126 3737,4117 3737,4091 v1(3738,4090) ; J28.7@3863.12,4303 3867.12,4299 R249.2@3979.44,4299 3979.44,4335.44 v1(3994,4350) ; J26.4@5245,945 v1(5245,1030)
  L3_HS1 w6: v1(3994,4350) 3995,4349 3995,4267.51 3998.51,4264 4165.57,4264 4256.57,4355 4405.57,4355 4407.57,4357 5998.43,4357 6011.43,4344 6014.19,4344 6015.19,4343 6046.43,4343 6388.25,4343 6391.77,4339.49 6391.77,1987.04 6392,1986.81 6392,1951.19 6391.77,1950.96 6391.77,1711.81 6388.25,1708.29 6141.86,1708.29 6102.57,1669 5611.62,1669 4980,1037.38 4980,997 4984,993 5078.49,993 5082,996.51 5082,1035.38 5089.62,1043 5100.38,1043 5108,1035.38 5108,1024.62 5115.62,1017 5155,1017 5181,1043 5232,1043 v1(5245,1030)
  L5_SIG w6: v1(3738,4090) 3860.57,4212.57 3872.57,4212.57 3994,4334 v1(3994,4350)
T_VCP_RX: D24.1 J26.13 R256.1 | length 12276.1
  L1_TOP w6: v1(1766,4307) 1793,4307 R256.1@1794,4306 ; v1(4910,785) J26.13@4995,785 4995,703.76 4985,693.76 D24.1@4985,691.3
  L8_BOTTOM w6: 675.62,2850.5 636.38,2869.5 cw(c656,2910) 617.17,2887.25 502.1,3083.64 498.58,3087.15 493.61,3087.15 490.09,3083.64 490.09,2549.28 482,2541.19 482,2115.88 497,2100.88 497,1475.62 801,1171.62 801,697.62 1161.62,337 1637,337 1860,114 3006,114 3013,107 4560.38,107 4926.19,472.81 4926.19,478.19 5117,669 5117,679.86 5120,682.86 5120,691.14 5120,704.53 5105.53,719 5091.38,719 5071.77,738.62 4956.38,738.62 v1(4910,785) ; 675.64,2850.49 796.22,2792 1433.54,2757.07 ccw(c1436,2802) 1447.94,2845.39 644.06,3066.61 cw(c656,3110) 620.75,3082.03 487.72,3249.69 462,3275.42 462,3376.58 487.72,3402.31 509,4045.24 509,4059.38 516.62,4067 530.76,4067 720.62,4164 984.62,4183 993.62,4192 1004.38,4192 1013.38,4183 1566.45,4183 1568.2,4184.72 1692.54,4307 v1(1766,4307)
T_VCP_TX: J26.14 R255.1 | length 8833.5
  L1_TOP w6: R255.1@2461.56,4411 2461.56,4407.06 2482.34,4386.28 2489.72,4386.28 v1(2514,4362) ; v1(4993,1032) 4993,947 J26.14@4995,945
  L3_HS1 w6: v1(2514,4362) 2804.59,4362 2808.88,4357.71 3097.85,4357.71 3102.14,4362 3113.38,4362 3291,4539.62 3291,4550.38 3284,4557.38 3284,4585.47 3298,4599.47 3298,4613.62 3310.86,4626.47 3345.01,4626.47 3356,4615.49 3356,4524.51 3359.51,4521 3428.62,4521 3583.62,4366 4005.49,4366 4009,4362.49 4009,4280.51 4012.51,4277 4164.43,4277 4252.43,4365 4401.43,4365 4403.43,4367 6002.57,4367 6015.57,4354 6018.33,4354 6019.33,4353 6398.25,4353 6401.77,4349.49 6401.77,1991.18 6402,1990.95 6402,1947.05 6401.77,1946.82 6401.77,1701.81 6398.25,1698.29 6146,1698.29 6106.71,1659 5620,1659 v1(4993,1032)
T_VSS: C10.1 C11.1 C48.1 C49.1 C50.1 C51.1 C52.1 C53.1 C54.1 C55.1 C56.1 C57.1 C58.1 C59.1 C60.1 C61.1 C62.1 C63.1 C64.1 C65.1 C66.1 C67.1 C68.1 C69.1 C70.1 C96.1 C118.1 C122.1 C123.1 C126.1 C127.1 C128.1 C129.1 C156.1 C157.1 C158.1 C159.1 C160.1 C171.1 CN3.40 J7.2 J7.4 J8.1 J10.3 J11.1 J11.2 J17.3 J20.05 J26.3 J27.1 J28.1 J28.2 L5.2 L8.2 LD5.2 LD6.2 LD7.1 LD8.2 M1.A7 M1.B2 M1.B7 M1.C9 M1.D9 M1.E1 M1.F15 M1.L1 M1.L7 M1.M15 M1.N9 M1.P2 M1.P7 M1.R7 M2.A6 M2.D6 M2.E1 M3.D8 M3.F1 M3.G5 M4.B2 M4.C2 M4.D2 M4.E9 M4.G2 M5.50 M6.9 M14.22 M14.26 M18.A4 M18.B3 M25.1 M25.24 M25.36 M25.48 M29.48 M30.48 M31.5 M32.9 R1.1 R2.1 R90.1 R93.1 R96.1 R101.2 R103.1 R106.1 R107.1 R108.1 R109.1 R111.1 R127.2 R128.2 R129.2 R139.1 R145.2 R147.2 R152.2 R153.2 R154.2 R173.1 R181.1 R182.1 R186.2 R197.2 R198.2 R199.1 R200.1 R201.1 R202.1 R203.1 R206.2 R208.1 R226.2 RV1.3 S2.1 S2.2 T3.3 U1A.B1 | length 49962.6
  L1_TOP w2: M18.B3@4356.5,3632.75 M18.A4@4372.25,3648.5 ; v1(4575,4002) 4603,4002 4613,3992 4645.31,3992 M4.C2@4655.94,3981.37 v1(4655.94,3961.69) ; v1(4600,4011) 4646,4011 M4.B2@4655.94,4001.06 ; v1(4650,3844) 4666,3860 4666,3892.57 M4.G2@4655.94,3902.63
  L1_TOP w4: M18.A4@4372.25,3648.5 4372.25,3662.35 4380,3670.1 4380,3694.44 4390,3704.44 R111.1@4469.67,3704.44 4473.6,3704.44 4507.04,3671 4552.61,3671 4602.38,3720.78 4602.38,3764.71 4591.09,3776 4566.24,3776 4554.95,3787.29 4554.95,3819.82 4577.97,3842.85 4648.85,3842.85 v1(4650,3844) ; M4.E9@4794,3942.26 4794.26,3942 4842.84,3942 4849.84,3935 v1(4852,3935) ; 5559.65,2753 5577.66,2734.99 M1.B2@5595.02,2734.99 ; M3.G5@5897.37,3775.78 5919,3754.15 5919,3682.16 5917,3680.16 v1(5917,3606)
  L1_TOP w6: C52.1@299,349.33 303.3,353.64 338.7,353.64 C63.1@343,349.33 C53.1@390,349.33 C54.1@435,349.33 435.33,349 C55.1@478,349 521.83,349 C62.1@522,349.17 522.17,349 C59.1@567,349 610.83,349 C60.1@611,349.17 C48.1@658,349.17 C66.1@703,349.17 703.17,349.33 C49.1@747,349.33 747.08,349.33 771.48,324.94 777.44,324.94 786.38,316 v1(788,316) 809,337 809,387.23 771.56,424.67 R181.1@771.56,488 771.56,491.94 809.56,529.94 R182.1@809.56,627 ; v1(903,3640) R226.2@903,3590.5 ; v1(947,3633) 945.5,3633 R226.2@903,3590.5 ; v1(1007,4417) 1015.2,4417 1039,4440.8 M14.22@1058,4440.8 ; R186.2@1042.56,400 1042.56,403.94 1057.51,418.89 ; C122.1@1056.17,1618 1056.17,1596.18 1052.22,1592.23 R197.2@1052.22,1576.72 ; M14.26@1058,4543.16 1119.32,4543.16 C118.1@1125.17,4549 1125.17,4548.92 1137,4537.08 1137,4500.8 1077,4440.8 M14.22@1058,4440.8 ; v1(1078,439) 1077.62,439 1057.51,418.89 ; v1(1640,4440) 1058.8,4440 M14.22@1058,4440.8 ; v1(1740,1621) 1740,1687.53 1596.53,1831 1490.35,1831 1261.05,1601.7 1094.86,1601.7 1069.88,1576.72 R197.2@1052.22,1576.72 ; v1(1742,1558) 1781.12,1597.12 1781.12,1598.78 C123.1@1787.33,1605 ; C10.1@1850,3033.67 C11.1@1805,3033.67 1710.76,3033.67 J8.1@1635,3109.43 1596,3070.42 1596,2994.84 1669.83,2921.01 1745.83,2921.01 1768.42,2898.42 S2.2@1768.42,2893.5 S2.1@1768.42,2580.5 1768.42,2575.58 1799.49,2544.51 1799.49,2539.54 1696.26,2436.3 1571.16,2436.3 935.5,1800.64 935.5,1495.42 922.02,1481.94 922.02,1409.22 903.64,1390.84 903.64,1380.07 911.26,1372.45 922.02,1372.45 982,1432.43 982,1806.51 1588.49,2413 1850,2413 J11.2@2004,2259 J11.1@2004,2159 ; C10.1@1850.08,3033.67 1856.3,3039.88 1856.3,3039.97 1946.74,3130.4 1946.74,3160 ; J7.4@1868,3475.02 1856,3463.02 v1(1856,3306) 1868,3294 J7.2@1868,3226.98 1868,3217.14 1894.53,3190.61 1916.12,3190.61 1946.74,3160 ; R208.1@2024.44,731 2024.44,734.94 1934.4,824.97 T3.3@1934.4,1082 2090.38,1082 2151.22,1142.84 2151.22,1337.6 2157,1343.38 v1(2157,1345) ; M29.48@2154.5,3154 2148.5,3160 C171.1@2053,3160 1946.74,3160 ; v1(2212,4369) 2211.62,4369 2178.56,4402.06 R2.1@2178.56,4406 2260.44,4406 R1.1@2262.44,4408 ; v1(2627,4566.77) 2627,4571.28 2969.72,4914 2985.38,4914 2997,4925.62 v1(2997,4942) 3027.1,4942 L5.2@3030.1,4945 ; v1(2672,2221) 2684.37,2233.37 2695.87,2233.37 2717.06,2254.56 R96.1@2721,2254.56 2721,2421.4 2756.6,2457 M31.5@2775.3,2457 ; v1(2877,1470) 2877,1436.56 R153.2@2877.56,1436 2885.12,1443.56 R152.2@2923,1443.56 ; CN3.40@2918,1606 2918,1493.56 R154.2@2916.44,1492 2916.44,1450.12 R152.2@2923,1443.56 ; v1(3122,3091) 3138.33,3107.33 3188.95,3107.33 3216.06,3134.44 R90.1@3220,3134.44 3255.05,3134.44 3272.49,3117 3358.51,3117 3368,3126.49 3368,3154 v1(3421,3207) ; J27.1@3183.12,4139 3194.69,4150.57 3615.83,4150.57 3618.26,4153 v1(3619.88,4153) J28.2@3702.88,4153 ; v1(3278,2935) 3278,2954 3291,2967 3372.53,2967 U1A.B1@3385.05,2954.48 ; R127.2@3401.44,4355 3401.44,4358.94 3412.22,4369.72 3425.21,4369.72 ; v1(3410,4660) 3427.16,4677.16 M6.9@3427.16,4711.16 ; R128.2@3456.56,4206 3456.56,4209.94 3425.21,4241.28 3425.21,4369.72 ; R129.2@3456.56,4405 R129.2@3456.56,4401.06 ; R145.2@3456.56,4554 3458,4555.44 3458,4579 v1(3478,4599) 3505,4626 3628.62,4626 3662.06,4659.44 R139.1@3666,4659.44 3713.61,4659.44 C96.1@3715.17,4661 ; v1(3499,4352.84) 3499,4358.62 R129.2@3456.56,4401.06 ; v1(3688,3226) 3688,3224.38 3697.28,3215.09 3697.28,3197.34 3708.06,3186.56 R107.1@3712,3186.56 ; v1(3721,1226) 3719.85,1224.85 3719.85,1214.25 3719.3,1213.7 ; L8.2@3742.1,1168 3726.6,1183.5 3726.6,1206.4 3719.3,1213.7 ; v1(3767,4152) 3767,4333.44 3764.8,4335.64 3764.8,4487.91 3767,4490.1 3767,4638.61 3773.05,4644.66 3773.05,4677.34 3763.09,4687.3 3748.95,4687.3 3747.78,4688.47 3747.78,4733.62 3751.88,4737.72 3785.24,4737.72 3791.2,4731.76 3791.2,4687.48 3793.05,4685.63 3793.05,4636.37 3791.2,4634.52 3791.2,4181.39 3792.22,4180.37 3792.22,4159.98 3799.2,4153 J28.1@3863.12,4153 v1(3972.67,4153) ; v1(3788,1240) 3860.33,1240 3870,1230.33 3870,1176.47 3903.19,1143.28 3963.26,1143.28 3973.22,1153.24 3973.22,1195.06 3980.88,1202.72 4014.24,1202.72 4018.34,1198.62 4018.34,1157.38 4017,1156.05 M25.1@4017,1129.8 4040.82,1129.8 M25.48@4072.91,1161.88 ; C128.1@3817,599.17 3817.08,599.17 3880.28,662.37 3880.28,672.38 3890.24,682.34 3900.26,682.34 3975.48,757.56 R206.2@4017,757.56 4020.94,757.56 4071.38,808 v1(4289,808) 4289.22,808.22 M25.24@4289.22,855.71 ; M25.48@4072.91,1185.7 M25.48@4072.91,1161.88 ; C51.1@4093,3182.83 C50.1@4048,3182.83 4004.17,3182.83 C65.1@4004,3182.67 C64.1@3959,3182.67 C61.1@3915,3182.67 C58.1@3869,3182.67 C57.1@3822,3182.67 3777.33,3182.67 C56.1@3777,3183 3773.44,3186.56 3715.94,3186.56 3740.05,3210.67 3743.28,3210.67 3811.62,3279 3816.38,3279 R200.1@4106.44,3569.06 ; C51.1@4099.3,3189.05 4109.47,3199.22 4152.2,3199.22 4166.1,3185.32 4166.1,3167.8 4180,3153.9 4180,3148.51 4176.49,3145 4149.82,3145 4149.7,3145.12 4146.22,3145.12 C70.1@4140,3151.33 ; C126.1@4107.17,3473 C127.1@4107.17,3518 4107.17,3572.27 R200.1@4106.44,3573 4106.44,3576.94 4076.22,3607.16 4076.22,3612.22 R199.1@4065.44,3623 R202.1@4065.44,3673 R203.1@4065.44,3723 4065.44,3726.94 4092.95,3754.45 4256.71,3754.45 4264.33,3762.06 4264.33,3771.62 4285,3792.29 4285,3954.7 4239,4000.7 J17.3@4239,4007 ; C70.1@4148.12,3143.3 4164.42,3127 4196,3127 v1(4197,3128) ; LD5.2@4243.3,194 4243.3,232 LD6.2@4242.3,233 LD8.2@4242.3,271 4242.3,307 LD7.1@4240.3,309 4240.3,310.97 4229.83,321.44 C129.1@4229.83,362 4229.83,675 4230.7,675.87 4230.7,675.95 4236.92,682.17 C159.1@4237,682.17 4237.08,682.17 4247.55,671.7 4307.62,671.7 4323.83,687.92 C158.1@4323.83,688 4324,688.17 C157.1@4324,734 C156.1@4324,782 4372,782 C160.1@4378,788 ; M25.24@4289.44,857.35 4333.38,857.35 4447.81,971.79 4459.75,971.79 4481.34,993.38 4481.34,1048.96 4426.22,1104.08 4426.22,1109.62 v1(4405.56,1130.29) ; J10.3@4327.03,1586 4405.56,1507.48 v1(4405.56,1130.29) ; v1(4339,3789) 4339,3752.22 R201.1@4340.22,3751 4340.22,3747.06 4364.29,3723 4414.49,3723 4418,3726.51 4418,3747.67 C67.1@4418.33,3748 ; M25.36@4345.35,1129.8 4342.83,1127.28 4310.11,1127.28 4295.32,1112.49 4121.86,1112.49 4080.08,1154.28 4080.08,1154.71 M25.48@4072.91,1161.88 ; M25.36@4345.84,1130.29 v1(4405.56,1130.29) ; v1(4408,850) 4378,820 C160.1@4378,788 ; C68.1@4418.5,3837 4418.5,3792.17 C69.1@4418.67,3792 4418.33,3791.67 C67.1@4418.33,3748 ; v1(4458,3118) 4479.56,3139.56 R93.1@4479.56,3171 4558,3171 M30.48@4568,3181 ; R111.1@4469.67,3704.44 4458.89,3715.22 4451.03,3715.22 4418.33,3747.92 C67.1@4418.33,3748 ; v1(4481,4060) 4551,4060 v1(4600,4011) ; v1(4557,5268) 4568.53,5279.53 M32.9@4568.53,5387.53 ; v1(5011,3819) 5011,3773.84 M5.50@5018,3766.84 ; J26.3@5245,785 v1(5245,700) ; v1(5317,2397) 5373,2341 5578.98,2341 M1.P2@5595.02,2357.04 ; J20.05@5375.94,1266 5381.35,1260.59 5426.41,1260.59 5446,1241 5446,703.51 5442.49,700 v1(5245,700) ; v1(5382,2543) 5382,2542.86 5425.31,2499.55 5425.31,2493.69 5467.47,2451.53 M1.L1@5563.52,2451.53 ; v1(5393,3824) 5394.15,3825.15 5398.12,3825.15 5431.55,3858.57 R101.2@5435.49,3858.57 5553.4,3858.57 5606.98,3805 v1(5641,3805) 5641.91,3805 5652.06,3815.15 M3.F1@5739.89,3815.15 ; v1(5406,2614) 5420,2628 5542.33,2628 5549.97,2635.63 5558.58,2635.63 5563.45,2640.5 M1.E1@5563.52,2640.5 ; v1(5430,3289.54) 5430,3268.88 5441.2,3257.68 5507.26,3257.68 5509.94,3255 5576,3255 5585,3264 5703.64,3264 M2.E1@5704,3263.64 ; v1(5449,2786) 5526.65,2786 5559.65,2753 ; 5577.66,2734.99 5619.16,2693.5 5691.42,2693.5 5697.93,2700 5697.93,2769.98 5692,2775.91 5692,2835.38 5699.62,2843 5734.98,2843 5740.83,2837.15 5751.83,2837.15 v1(5752.98,2836) ; v1(5729,2205) 5729.43,2205.43 5729.43,2302.48 M1.R7@5752.5,2325.54 ; v1(5735,2343) 5738.46,2343 M1.P7@5752.5,2357.04 ; v1(5737,2431) 5738.15,2432.15 5738.15,2437.18 5752.24,2451.28 M1.L7@5752.24,2451.78 ; 5752.5,2342.19 M1.P7@5752.5,2357.04 ; M1.B7@5752.5,2734.99 M1.A7@5752.5,2766.49 v1@5752.5,2835.52 ; M1.N9@5815.49,2388.54 5815.49,2388.08 5800.41,2373 5800.41,2323.27 5807.06,2316.62 5807.06,2181.67 5792.38,2167 5773.61,2167 5752,2188.62 5752,2246.83 5760.93,2255.76 5760.93,2297.54 5755,2303.46 5755,2318.11 5753.04,2320.07 5753.04,2324.77 5753.82,2325.54 5752.5,2326.86 5752.5,2339.69 5755,2342.19 5753.04,2344.15 5753.04,2356.49 M1.P7@5752.5,2357.04 ; M1.D9@5815.49,2672 M1.C9@5815.49,2703.5 5831.98,2687 v1(5864,2687) 5921.49,2687 5932.05,2676.43 5932.05,2606.51 5942.62,2595.94 5980.6,2595.94 5984.54,2592 5987.46,2592 M1.F15@6004.46,2609.01 ; v1(5840,3436) 5852,3424 5852,3382.83 M2.A6@5851.64,3382.47 ; M2.D6@5852.36,3293.89 5852.72,3293.53 5938.72,3293.53 5942.74,3289.51 6035.51,3289.51 6182.66,3436.66 6182.66,3445.22 R109.1@6193.44,3456 6001,3456 v1(5976,3431) ; M3.G5@5897.37,3775.78 5914.53,3792.94 5914.53,3798.53 v1(5915.68,3799.68) ; M1.M15@6004.46,2420.03 6020.5,2404 6064,2404 v1(6065,2405) ; M3.D8@6015.61,3894.02 v1@6174.35,3894.02 ; v1(6174.48,3894.15) 6193.49,3894.15 6197.48,3898.14 6197.48,3982.42 6197,3982.9 6197,4239.56 R106.1@6296,4338.56 6292.44,4342.12 R108.1@6292.44,4384 ; R226.2@903,3590.5 903,3586.56 R226.2@901.44,3585 901.44,3588.94 R226.2@903,3590.5 ; R197.2@1041.44,1562 1041.44,1565.94 R197.2@1052.22,1576.72 ; R197.2@1041.44,1562 1041.44,1558.06 1062.22,1537.28 1062.22,1488.72 1041.44,1467.94 R198.2@1041.44,1464 1041.44,1340.22 1156.72,1224.94 1156.72,1115.88 1145.84,1105 1118.16,1105 998.78,985.62 998.78,578.38 1057.51,519.65 1057.51,418.89 ; R197.2@1041.44,1562 1052.22,1572.78 R197.2@1052.22,1576.72 ; R152.2@2923,1443.56 2926.94,1443.56 3025,1345.5 3025,1285.78 3077.78,1233 3116.43,1233 3123.43,1226 3143.28,1226 3151.56,1217.72 R173.1@3151.56,1191 3159.56,1183 3159.56,1156.28 3203.06,1112.79 3382.12,1112.79 3392.12,1102.79 3596.79,1102.79 3614.19,1120.19 3632.57,1120.19 3644.39,1132.01 3644.39,1154.44 3644.15,1154.68 3644.15,1164.29 3644.27,1164.41 3644.27,1195 3662.97,1213.7 3719.3,1213.7 ; 3425.21,4369.72 R129.2@3456.56,4401.06 ; C160.1@4378,788 4394.05,804.05 4716.68,804.05 4872.4,648.33 5193.33,648.33 v1(5245,700)
  L3_HS1 w6: v1(788,316) 955,316 v1(1078,439) ; v1(903,3640) 903,4313 v1(1007,4417) ; v1(947,3633) 1111.07,3468.93 1693.07,3468.93 v1(1856,3306) ; v1(1640,4440) 1520,4320 1520,4156.79 1540,4136.79 1540,3718.16 1551.37,3706.79 1625.64,3706.79 1643.21,3724.36 1643.21,3963.21 1619,3987.43 1619,4206.38 1781.62,4369 v1(2212,4369) 2212,4454.06 2197.48,4468.58 2197.48,4631.48 2223,4657 2536.77,4657 v1(2627,4566.77) ; v1(3721,1226) 3735,1240 v1(3788,1240) ; v1(4289,808) 4366,808 v1(4408,850) ; v1(5011,3819) 5386.49,3819 5391.49,3824 v1(5393,3824) ; v1(5317,2397) 5317,2427.62 5323,2433.62 5323,2462.62 5317,2468.62 5317,2569.38 5324.62,2577 5348,2577 v1(5382,2543) ; v1(5430,3289.54) 5491.54,3228 5533.14,3228 5539,3222.14 5539,3183.75 5547.76,3174.99 5547.76,3155.93 5504,3112.18 5504,3014.38 5521,2997.38 5521,2858 v1(5449,2786)
  L5_SIG w6: v1(2997,4942) 3279,4660 v1(3410,4660) ; v1(3122,3091) 3186,3027 3186,3015.57 3247.57,2954 3259,2954 v1(3278,2935) ; v1(3421,3207) 3443.62,3207 3449.62,3201 3526.47,3201 3553.47,3228 3638.42,3228 3640.42,3226 v1(3688,3226) ; v1(3499,4352.84) 3555.93,4352.84 3559.44,4349.33 3559.44,4213.44 v1(3619.88,4153) ; v1(4481,4060) 4484,4063 4484,4079.62 4501.57,4097.19 4518.19,4097.19 4539,4118 4539,5250 v1(4557,5268) v1@4558.15,5269.15 ; v1(5641,3805) 5663,3783 5899,3783 v1(5915.68,3799.68) ; v1(5752.98,2836) 5752.98,2798.02 v1(5864,2687) 6117.49,2687 6121,2683.49 6121,2461 v1(6065,2405) ; v1(5840,3436) 5840,3466.53 5821.53,3485 5807,3485 5798,3494 5798,3602.49 5801.51,3606 v1(5917,3606)
  L6_HS2 w6: v1(1742,1558) 1742,1348.51 1745.51,1345 ; J11.2@2004,2259 2521.25,2259 2565.75,2214.5 2616.55,2214.5 2623.05,2221 v1(2672,2221) ; v1(2157,1345) 1745.51,1345 ; v1(2877,1470) 2807,1400 2331,1400 2251,1320 1526.37,1320 1514,1332.37 1514,1708.38 1521.62,1716 1532.38,1716 1611,1637.38 1611,1451.62 1717.62,1345 1745.51,1345 ; v1(3478,4599) 3478,4373.84 v1(3499,4352.84) ; v1(3972.67,4153) 3972.67,4110.71 3988,4095.38 3988,4031 4101,3918 4150,3918 J17.3@4239,4007 ; v1(4655.94,3961.69) 4655.94,3960.06 4650,3954.12 v1(4650,3844) 4667,3827 4719.62,3827 4721.62,3829 4811.38,3829 4855,3872.62 4855,3911.38 4852,3914.38 v1(4852,3935) ; v1(5317,2397) 5308,2406 5308,2424 5359,2475 5365.14,2475 5369.14,2479 5388.1,2479 5389.1,2478 5402.53,2478 5403.53,2477 5426.53,2477 5448.53,2455 5675.22,2455 5703.96,2426.26 5703.96,2374.04 v1(5735,2343) 5735,2367 5748,2380 5748,2420 v1(5737,2431) ; v1(5382,2543) 5382,2602 5392.85,2612.85 5404.85,2612.85 v1(5406,2614) 5406,2634.62 5411,2639.62 5411,2748 v1(5449,2786)
  L8_BOTTOM w4: v1(4575,4002) 4577.03,4002 4586.03,4011 v1(4600,4011)
  L8_BOTTOM w6: v1(1078,439) 1926,439 RV1.3@2057,308 ; v1(1742,1558) 1741,1559 1741,1620 v1(1740,1621) 1774,1655 1774,2036.51 1996.49,2259 J11.2@2004,2259 ; v1(3410,4660) 3456.85,4613.15 3456.85,4607.15 3463.85,4600.15 3476.85,4600.15 v1(3478,4599) ; v1(3619.88,4153) 3620.38,4152.5 3766.5,4152.5 v1(3767,4152) ; v1(4197,3128) 4198.15,3126.85 4198.15,3116.31 4204.46,3110 4434,3110 4442,3118 v1(4458,3118) ; J17.3@4239,4007 4239,3887 4334,3792 4334.38,3792 4337.38,3789 v1(4339,3789) ; v1(4852,3935) 4852,3915.62 4883.62,3884 4946,3884 v1(5011,3819) ; v1(5430,3289.54) 5430,3348.68 5401.1,3377.58 5401.1,3435.1 5492,3526 5492,3561 5582,3651 5583.62,3651 5586.62,3654 5597.38,3654 5689.36,3562.02 5844.98,3562.02 5849.59,3557.41 5849.79,3557.41 5863.26,3543.94 5863.26,3543.74 5970.19,3436.81 ; v1(5840,3436) 5969.38,3436 5974.38,3431 v1(5976,3431) ; v1(5917,3606) 5939.97,3606 6067,3733.03 6067,3897.94 6164.95,3995.89 6184.01,3995.89 6197.48,3982.42 6197.48,3917.15 v1(6174.48,3894.15)
TD_N: J21.4 M6.20 M7.2 R132.1 | length 3996.1
  L1_TOP w6: v1(3008,4717) 3007.5,4716.5 3007.5,4702 3007.74,4701.76 3048.59,4701.76 J21.4@3053.75,4696.6 3053.75,4669.11 3050.24,4665.6 2918.72,4665.6 2907,4677.31 2907,4787.86 2996.14,4877 3207.79,4877 3208.51,4877.72 3298.16,4877.72 3327.66,4907.22 3334.1,4913.66 3435.9,4913.66 3462.19,4887.38 3462.19,4874.34 3466.53,4869.99 M6.20@3466.53,4858.84 ; R132.1@3557,4935.44 3567.56,4946 v1(3611,4946)
  L3_HS1 w6: M7.2@1700.91,5247.02 1700.91,5260.31 1687.62,5273.6 1687.62,5325.49 1691.14,5329 1819.2,5329 1822.71,5325.49 1822.71,5242.45 1829.16,5236.01 1874.15,5236.01 1881.64,5243.5 2383.91,5243.5 2452.17,5175.24 3130.43,5175.24 3353.67,4952 3604.49,4952 3610.49,4946 v1(3611,4946)
  L8_BOTTOM w6: v1(3008,4717) 3009.15,4718.15 3009.15,4723.8 3056.25,4770.91 3056.25,4781.07 3105.02,4829.84 3304.51,4829.84 3426.67,4952 3604.49,4952 3610.49,4946 v1(3611,4946)
TD_P: J21.3 M6.21 M7.1 R133.1 | length 3889.3
  L1_TOP w6: J21.3@2946.25,4696.6 2940.01,4702.84 2921.51,4702.84 2918,4706.36 2918,4783.3 3000.7,4866 3212.35,4866 3213.06,4866.72 3302.72,4866.72 3338.66,4902.66 3431.35,4902.66 3451.19,4882.82 3451.19,4874.34 3446.84,4869.99 M6.21@3446.84,4858.84 ; J21.3@2946.54,4696.31 2951.98,4701.76 2988.49,4701.76 2992,4705.27 2992,4725 v1(2993,4726) ; R133.1@3505,4938.44 3508.94,4938.44 3539.5,4969 v1(3611,4969)
  L3_HS1 w6: M7.1@1600.91,5297.02 1616.71,5312.81 1616.71,5330.06 1626.65,5340 1823.76,5340 1833.71,5330.04 1833.71,5247.01 1869.6,5247.01 1877.08,5254.5 2388.47,5254.5 2456.73,5186.24 3134.99,5186.24 3358.23,4963 3604.49,4963 3610.49,4969 v1(3611,4969)
  L8_BOTTOM w6: v1(2993,4726) 3001,4734 3045.25,4778.25 3045.25,4785.63 3100.46,4840.84 3299.96,4840.84 3422.12,4963 3604.49,4963 3610.49,4969 v1(3611,4969)
TDO/SWO: R5.1 R251.1 | length 277.2
  L1_TOP w6: R5.1@1682,4400 1692.78,4410.78 1692.78,4502.78 1697,4507 R251.1@1861,4507
TOUCH_INT: M5.39 M25.27 | length 7830.5
  L1_TOP w6: v1(4285.14,952.14) M25.27@4344.85,952.14 ; M5.39@5185.32,3373.14 5271.86,3373.14 v1(5290,3355)
  L5_SIG w6: v1(4285.14,952.14) 4418.56,1085.56 4418.56,1173.94 4928.62,1684 6072,1684 6164,1776 6164,3886.25 6146.25,3904 5964.49,3904 5958.75,3898.26 5946.58,3898.26 5933.11,3884.79 5933.11,3840.17 5934,3839.28 5934,3794.67 5767,3627.67 5767,3445.38 5768,3444.38 5768,3418.28 5738.47,3388.76 5738.47,3329 5710.51,3301.04 5710.51,3152.51 5707,3149 5630.67,3149 5620.67,3139 5578.62,3139 5570,3130.38 5570,3119.62 5590.81,3098.81 5593.33,3098.81 5719,2973.14 5719,2893.37 5709.63,2884 5355.86,2884 4796,3443.86 4874.09,3521.94 4879.06,3521.94 5046,3355 v1(5290,3355)
U5V_ST_LINK: C130.1 J6.11 M21.1 | length 5506.6
  L1_TOP w6: C130.1@1927,3600.17 2082,3600.17 2146,3664.16 2146,3790 2153.73,3797.73 2187.42,3797.73 2193.22,3803.53 2193.22,3914.1 2187.42,3919.91 2159.27,3919.91 2147.72,3931.45 2147.72,3939.73 2159.27,3951.28 2161.83,3951.28 2170.52,3959.97 2170.52,3962.39 2179.21,3971.09 2339.08,3971.09 2361.38,3948.78 2403.2,3948.78 2445.87,3906.11 2475.62,3906.11 2492.91,3923.4 M21.1@2504.72,3923.4 2516.54,3923.4 2537.13,3944 2622.49,3944 2626,3940.49 2626,3504 2651,3479 3163.54,3479 v1(3172.54,3470)
  L4_POWER w6: v1(3172.54,3470) 3172.54,3501.63 3119.16,3555 3096.44,3555 3092.93,3551.49 3092.93,3460.25 3136.18,3417 3163.38,3417 3171,3409.38 3171,3398.62 3169,3396.62 3169,3157.36 3186.02,3140.34 3186.02,3117.15 3171,3102.13 3171,3074.62 3217.63,3027.99 3222.6,3027.99 3342.99,3148.38 3342.99,3187.62 3333,3197.62 3333,3208.38 3340.62,3216 3343.67,3216 3349.71,3222.05 ccw(c3345.47,3226.28) 3351.46,3226.13 ccw(c3345.47,3226.32) 3351.44,3226.91 ; 3351.43,3226.95 3350.24,3237.67 cw(c3389,3242) 3350,3241.64 3349.59,3285.79 3349.58,3287.25 3323,3331.29 3310,3363.78 3310,3373.06 3317.62,3380.68 3328.38,3380.68 3336,3373.06 3336,3370.16 3343,3357.58 3343,3339.57 3391.64,3290.93 cw(c3389,3242) 3411.87,3285.34 3453.96,3285.34 3488.1,3319.48 3488.1,3330.1 3501.62,3343.62 3549.42,3343.62 3620,3273.04 3620,3219.05 3660,3179.05 3660,3115.53 3675.44,3100.08 3680.41,3100.08 3726.02,3145.69 3726.02,3154.41 3749.62,3178 3800.38,3178 3869.38,3109 3952.42,3109 3990,3071.42 3990,3050.62 3997.62,3043 4000.62,3043 4005.62,3038 4016.38,3038 4024,3045.62 4024,3097.63 4033.37,3107 4086.72,3107 4093.72,3114 4167.67,3114 4176.67,3105 4218.14,3105 4260,3063.14 4260,3013.51 4253.49,3007 4222.72,3007 4212.72,2997 4163.28,2997 4154.94,3005.33 4131,3005.33 4130.67,3005 4122.3,3005 4105.3,2988 4077.01,2988 4055,2965.99 4055,2750.51 4147.51,2658 4216.14,2658 J6.11@4281.57,2592.57 ; J6.11@4292,2603 4297.66,2597.34 4297.66,2576.49